# Altium PCB PCB1.PcbDoc
Units mm, origin at the board's own origin, x right, y up, seen from the top; angles counter-clockwise.
Board outline 152.4 x 101.6 mm, 2 copper layers (Top Layer, Bottom Layer); 23 components, 48 nets, 153 pads, 0 vias.
Unrouted connection lines stored in the file: 73.
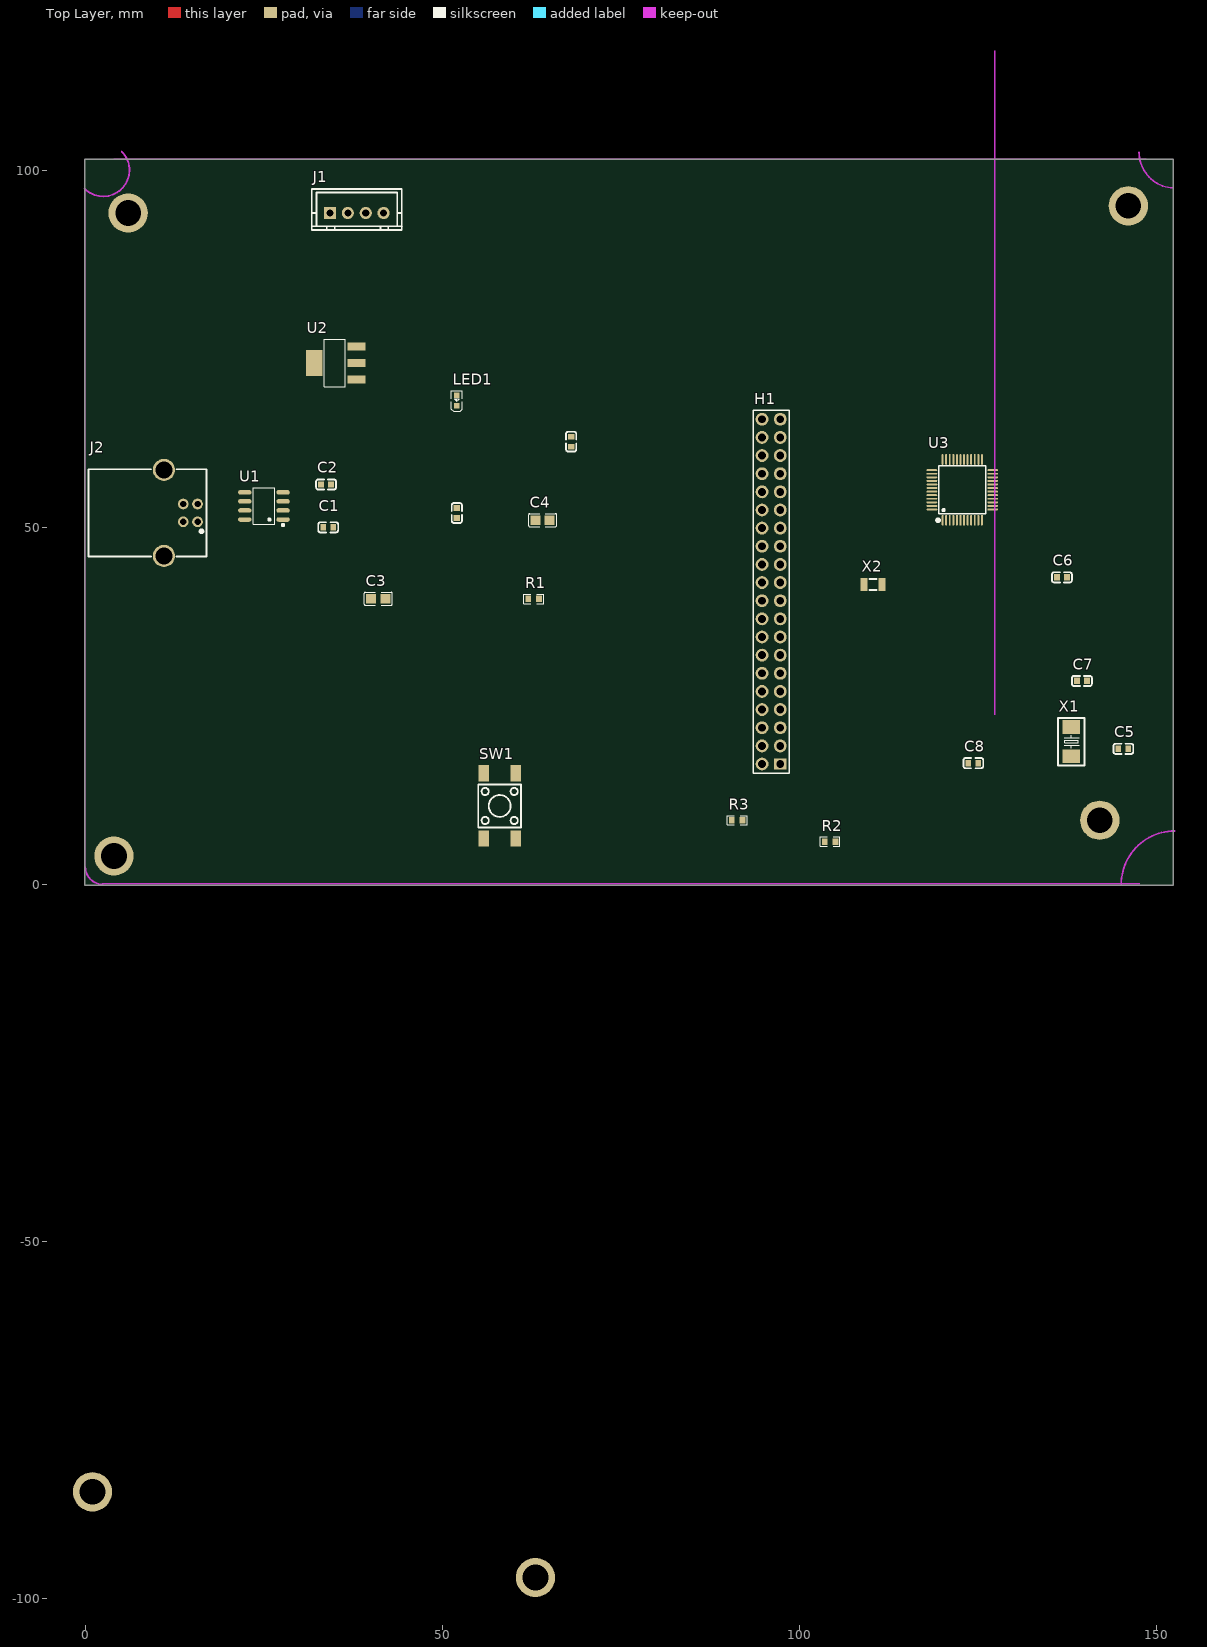
[diagram p0: Top Layer view]
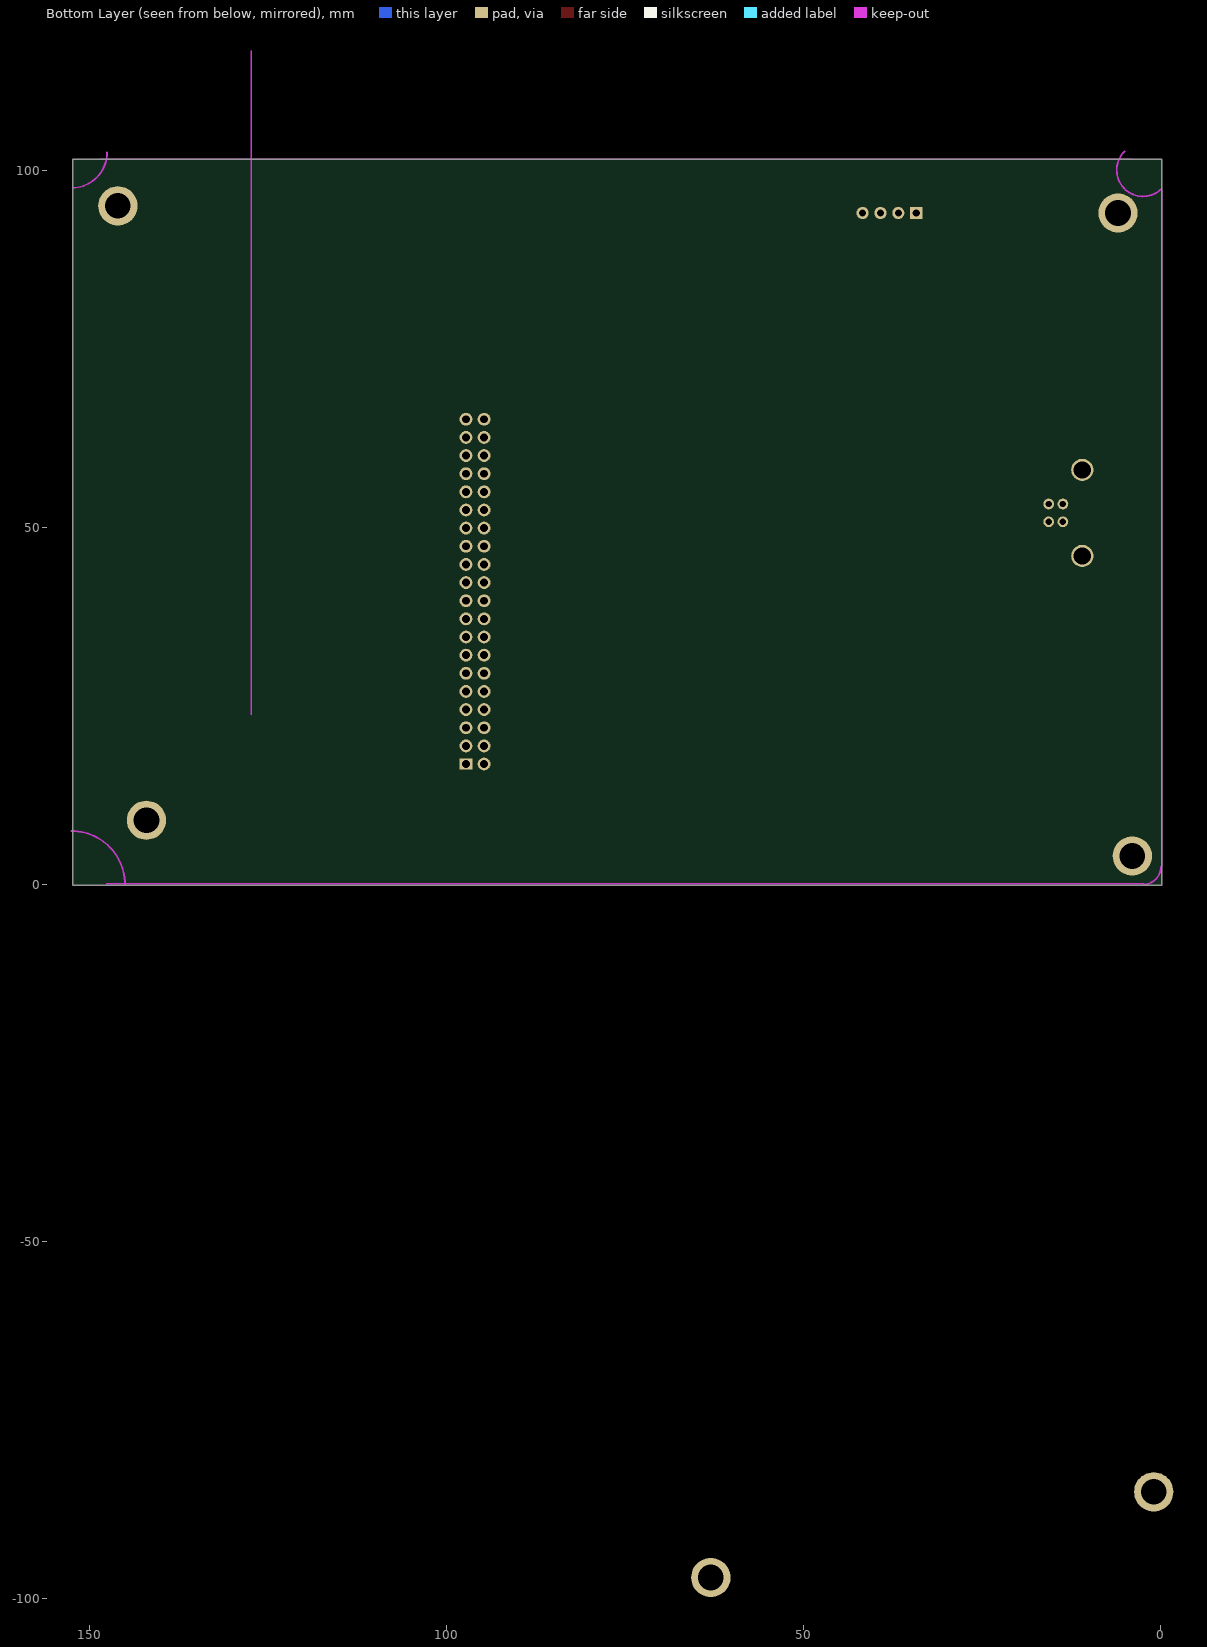
[diagram p1: Bottom Layer view, seen from below]

## Layer stack, top to bottom
Top Solder: solder mask 0.0102, Solder Resist, Dk 3.5
Top Layer: signal copper 0.0356
Dielectric 1: dielectric 0.32, FR-4, Dk 4.8
Bottom Layer: signal copper 0.0356
Bottom Solder: solder mask 0.0102, Solder Resist, Dk 3.5

## Board outline
-0.1,-0.1 152.3,-0.1 152.3,101.5 -0.1,101.5

## Design rules (kind name [scope] priority, off if disabled: settings)
Clearance [All] p1: gap=0.254 ignorepadtopadclearanceinfootprint=FALSE except(0: Arc-Hole Track-Hole SMDPad-Hole THPad-Hole Via-Hole Fill-Hole Poly-Hole Region-Hole Text-Hole)
PolygonConnect [All] p1: connectstyle=Relief reliefconductorwidth=0.254 reliefentries=4 polygonreliefangle="90 Angle" airgapwidth=0.254
RoutingVias [All] p1: holewidth=0.711 width=1.27 viastyle="Through Hole" minholewidth=0.711 minwidth=1.27 maxholewidth=0.711 maxwidth=1.27
SolderMaskExpansion [All] p1: expansion=0.102 istentingtop=FALSE
Width [All] p1: maxlimit=0.254 minlimit=0.254 preferedwidth=0.254
30 further rules are at their usual default settings.

## Components (designator, comment, footprint, x,y, rotation, side; value= is the part's Value field where it differs from the comment)
C1 "cc0603krx7r9bb104" C0603 34,50 r0 top value=100nF
C2 "cc0603krx7r9bb104" C0603 33.7,56 r0 top value=100nF
C3 "cl21a106kaynnne_c15850" C0805 41,40 r0 top value=10uF
C4 "cl21a106kaynnne_c15850" C0805 64,51 r0 top value=10uF
C5 "cc0603jrnpo9bn200" C0603 145.3,19 r0 top value=20pF
C6 "cc0603jrnpo9bn200" C0603 136.7,43 r0 top value=20pF
C7 "cc0603jrnpo9bn200" C0603 139.5,28.5 r0 top value=20pF
C8 "cc0603jrnpo9bn200" C0603 124.3,17 r0 top value=20pF
H1 "2.54mm 2*20p直排针" HDR-TH_40P-P2.54-V-M-R2-C20-S2.54 96,41 r90 top
J1 "xh-4a_c37815" CONN-TH_4P-P2.50_XH-4A 38,94 r0 top
J2 "921-111a1010d10200" USB-B_TH_USB-B-FEMALE-90 13.355,52.02 r270 top locked
LED1 "ncd0603c1" LED0603-RD 52,67.749 r90 top
R1 "0603waf1001t5e" R0603 62.753,40 r0 top value=1kΩ
R2 "0603waf1002t5e" R0603 104.247,6 r0 top value=10kΩ
R3 "0603waf1002t5e" R0603 91.247,9 r0 top value=10kΩ
SW1 "kh-6x6x5h-stm" SW-SMD_4P-L6.0-W6.0-P4.50-LS9.0_H5.0 58,11 r90 top
U1 "ch340n" SOP-8_L4.9-W3.9-P1.27-LS6.0-BL 25,53 r90 top
U2 "ams1117-3.3_c6186" SOT-223-3_L6.5-W3.4-P2.30-LS7.0-BR 35,73 r0 top
U3 "stm32f103c8t6" LQFP-48_L7.0-W7.0-P0.50-LS9.0-BL 122.75,55.25 r0 top
X1 "x50328msb2gi" CRYSTAL-SMD_L5.0-W3.2 138,20 r90 top value=8MHz
X2 "q13fc13500004_c32346" FC-135R_L3.2-W1.5 110.25,42 r0 top value=32.768kHz
? "cc0603krx7r9bb104" C0603 52,52 r90 top value=100nF
? "cc0603krx7r9bb104" C0603 68,62 r90 top value=100nF

## Footprints (in the part's own frame and the unit in brackets; to place one, negate y for a bottom-side part, rotate by r counter-clockwise, add the part's x,y. Pads: shape width x height; smd on the part's side, far side on the other; paste and mask are expansions set on the pad)
C0603 [mm]
  rect 0.8x0.9 smd: 1(-0.7,0) 2(0.7,0)
  silkscreen extent -1.39,-0.71 1.39,0.71
C0805 [mm]
  rect 1.41x1.35 smd paste-100 mask+0.051: 1(-1,0) 2(1,0)
  silkscreen extent -1.96,-0.9 1.96,0.9
CONN-TH_4P-P2.50_XH-4A [mm]
  rect 1.7x1.7 hole 1: 1(-3.75,0)
  round 1.7 hole 1: 2(-1.25,0) 3(1.25,0) 4(3.75,0)
  silkscreen extent -6.3,-2.4 6.31,3.38
CRYSTAL-SMD_L5.0-W3.2 [mm]
  rect 1.9x2.4 smd: 1(-2.05,0) 2(2.05,0)
  silkscreen extent -3.32,-1.85 3.33,1.85
FC-135R_L3.2-W1.5 [mm]
  rect 1x1.8 smd: 1(-1.25,0) 2(1.25,0)
  silkscreen extent -0.51,-0.76 0.51,0.76
HDR-TH_40P-P2.54-V-M-R2-C20-S2.54 [mm]
  rect 1.575x1.8 hole 1.1: 1(-24.13,-1.27)
  round 1.8 hole 1.1: 2(-24.13,1.27) 3(-21.59,-1.27) 4(-21.59,1.27) 5(-19.05,-1.27) 6(-19.05,1.27) 7(-16.51,-1.27) 8(-16.51,1.27) 9(-13.97,-1.27) 10(-13.97,1.27) 11(-11.43,-1.27) 12(-11.43,1.27) 13(-8.89,-1.27) 14(-8.89,1.27) 15(-6.35,-1.27) 16(-6.35,1.27) 17(-3.81,-1.27) 18(-3.81,1.27) 19(-1.27,-1.27) 20(-1.27,1.27) 21(1.27,-1.27) 22(1.27,1.27) 23(3.81,-1.27) 24(3.81,1.27) 25(6.35,-1.27) 26(6.35,1.27) 27(8.89,-1.27) 28(8.89,1.27) 29(11.43,-1.27) 30(11.43,1.27) 31(13.97,-1.27) 32(13.97,1.27) 33(16.51,-1.27) 34(16.51,1.27) 35(19.05,-1.27) 36(19.05,1.27) 37(21.59,-1.27) 38(21.59,1.27) 39(24.13,-1.27) 40(24.13,1.27)
  silkscreen extent -25.4,-2.54 25.4,2.54
LED0603-RD [mm]
  rect 0.8x0.8 smd: 1(-0.749,0) 2(0.749,0)
  silkscreen extent -1.49,-0.75 1.39,0.76
LQFP-48_L7.0-W7.0-P0.50-LS9.0-BL [mm]
  oval 0.27x1.5 smd paste+0 mask+0.05: 1(-2.75,-4.25) 2(-2.25,-4.25) 3(-1.75,-4.25) 4(-1.25,-4.25) 5(-0.75,-4.25) 6(-0.25,-4.25) 7(0.25,-4.25) 8(0.75,-4.25) 9(1.25,-4.25) 10(1.75,-4.25) 11(2.25,-4.25) 12(2.75,-4.25) 25(2.75,4.25) 26(2.25,4.25) 27(1.75,4.25) 28(1.25,4.25) 29(0.75,4.25) 30(0.25,4.25) 31(-0.25,4.25) 32(-0.75,4.25) 33(-1.25,4.25) 34(-1.75,4.25) 35(-2.25,4.25) 36(-2.75,4.25)
  oval 1.5x0.27 smd paste+0 mask+0.05: 13(4.25,-2.75) 14(4.25,-2.25) 15(4.25,-1.75) 16(4.25,-1.25) 17(4.25,-0.75) 18(4.25,-0.25) 19(4.25,0.25) 20(4.25,0.75) 21(4.25,1.25) 22(4.25,1.75) 23(4.25,2.25) 24(4.25,2.75) 37(-4.25,2.75) 38(-4.25,2.25) 39(-4.25,1.75) 40(-4.25,1.25) 41(-4.25,0.75) 42(-4.25,0.25) 43(-4.25,-0.25) 44(-4.25,-0.75) 45(-4.25,-1.25) 46(-4.25,-1.75) 47(-4.25,-2.25) 48(-4.25,-2.75)
  silkscreen extent -3.59,-4.46 3.3,3.34
R0603 [mm]
  rect 0.806x0.864 smd paste-100 mask+0.051: 1(-0.753,0) 2(0.753,0)
  silkscreen extent -1.39,-0.66 1.39,0.66
SOP-8_L4.9-W3.9-P1.27-LS6.0-BL [mm]
  oval 0.63x1.865 smd: 1(-1.905,-2.682) 2(-0.635,-2.682) 3(0.635,-2.682) 4(1.905,-2.682) 5(1.905,2.682) 6(0.635,2.682) 7(-0.635,2.682) 8(-1.905,2.682)
  silkscreen extent -2.82,-2.83 2.58,1.52
SOT-223-3_L6.5-W3.4-P2.30-LS7.0-BR [mm]
  rect 2.5x1.1 smd: 1(2.97,-2.3) 2(2.97,0) 3(2.97,2.3)
  rect 2.34x3.6 smd: 4(-2.97,0)
  silkscreen extent -1.57,-3.33 1.37,3.33
SW-SMD_4P-L6.0-W6.0-P4.50-LS9.0_H5.0 [mm]
  rect 2.3x1.5 smd: 1(-4.55,2.25) 2(4.55,2.25) 3(-4.55,-2.25) 4(4.55,-2.25)
  silkscreen extent -3,-3 3,3
USB-B_TH_USB-B-FEMALE-90 [mm]
  round 1.5 hole 0.9 copper offset 0,0: 1(1.25,2.355) 2(-1.25,2.355) 3(-1.25,0.355) 4(1.25,0.355)
  round 3.1 hole 2.4 copper offset 0,0: 5(-6.02,-2.355) 6(6.02,-2.355)
  silkscreen extent -6.1,-12.89 6.1,3.61

## Part data
C1 C2 ? ?: "容值:100nF;精度:±10%;额定电压:50V;温度系数:X7R;", JLCPCB Part Class="Basic Part", LCSC Part Name="100nF ±10% 50V", Manufacturer=YAGEO(国巨), ManufacturerPart=CC0603KRX7R9BB104, Temperature Coefficient=X7R, Tolerance=±10%, Voltage Rating=50V, AddInBom=yes, ConvertToPcb=yes, Datasheet=https://item.szlcsc.com/datasheet/CC0603KRX7R9BB104/15331.html, FootprintName=C0603, ModelId=ac125912035d415993ca9572d50418b1, ModelName=C0603_L1.6-W0.8-H0.8, ModelTransform=62.992,31.496,0,0,0,0,0,0,0, Supplier=LCSC, Supplier Footprint=0603, SupplierPart=C14663, SymbolName=CC0603KRX7R9BB104
C3 C4: "容值:10uF;精度:±10%;额定电压:25V;温度系数:X5R;", JLCPCB Part Class="Basic Part", LCSC Part Name="10uF ±10% 25V", Manufacturer=SAMSUNG(三星), ManufacturerPart=CL21A106KAYNNNE, Temperature Coefficient=X5R, Tolerance=±10%, Voltage Rating=25V, AddInBom=yes, ConvertToPcb=yes, Datasheet=https://item.szlcsc.com/datasheet/CL21A106KAYNNNE/16532.html, FootprintName=C0805, ModelId=1ba041120af144c991958decab20d241, ModelName=C0805_L2.0-W1.3-H1.3, ModelTransform=78.74,51.181,0,0,0,0,0,0.0005,0, Supplier=LCSC, Supplier Footprint=0805, SupplierPart=C15850, Symbol=CL21A106KAYNNNE
C5 C6 C7 C8: "容值:20pF;精度:±5%;额定电压:50V;材质(温度系数):NP0;", JLCPCB Part Class="Extended Part", LCSC Part Name="20pF ±5% 50V", Manufacturer=YAGEO(国巨), ManufacturerPart=CC0603JRNPO9BN200, Temperature Coefficient=NP0, Tolerance=±5%, Voltage Rated=50V, AddInBom=yes, ConvertToPcb=yes, Datasheet=https://atta.szlcsc.com/upload/public/pdf/source/20170505/1493957838062.pdf, FootprintName=C0603, ModelId=ac125912035d415993ca9572d50418b1, ModelName=C0603_L1.6-W0.8-H0.8, ModelTransform=62.992,31.496,0,0,0,0,0,0,0, Supplier=LCSC, Supplier Footprint=0603, SupplierPart=C105621, Symbol=CC0603JRNPO9BN200
H1: "插针结构:2x20P;间距:2.54mm;行距:2.54mm;圆针/方针:方针;安装方式:直插;排数:双排;总PIN位数:40P;额定电流:3A;额定电压:-;配合针长度:6mm;塑高:-;端接针长度:3mm;触头材质:黄铜;触头镀层:-;工作温度:-40℃~+105℃;颜色:黑色;", Color=黑色, Current Rating=3A, JLCPCB Part Class="Extended Part", LCSC Part Name="2x20P 间距:2.54mm 方针 直插", Manufacturer=BOOMELE(博穆精密), ManufacturerPart="2.54mm 2*20P直排针", Operating Temperature=-40℃~+105℃, Voltage Rating (Max)=-, AddInBom=yes, Circluar Pins/Square Pins=方针, Contact Material=黄铜, Contact Plating=-, ConvertToPcb=yes, Datasheet=https://item.szlcsc.com/datasheet/2.54mm%25202*20P%25E7%259B%25B4%25E6%258E%2592%25E9%2592%2588/51992.html, FootprintName=HDR-TH_40P-P2.54-V-M-R2-C20-S2.54, Insulation Height=-, Length of End Connection Pin=3mm, Length of Mating Pin=6mm, ModelId=2f697d2f705a4509bdac70452e51b3cc, ModelName=HDR-TH_40P-P2.54-M-LI-2X20P, ModelTransform=1999.996,196.85,0,0,0,0,0,0,-118.11, Mounting Type=直插, Number of Pins=40P, Number of Rows=双排, Pin Structure=2x20P, Pitch=2.54mm, Row Spacing=2.54mm, Supplier=LCSC, Supplier Footprint=插件,P=2.54mm, SupplierPart=C50980, Symbol=Header-Male-2.54_2x20
J1: "插针结构:1x4P;间距:2.5mm;安装方式:直插;参考系列:XH;总PIN数:4P;排数:1;每排PIN数:4;行距:-;额定电流:-;触头材质:-;触头镀层:-;工作温度:-;", Color=白色, Current Rating=-, JLCPCB Part Class="Extended Part", LCSC Part Name="1x4P 间距:2.5mm 直插 系列:XH", Manufacturer=BOOMELE(博穆精密), ManufacturerPart=XH-4A, AddInBom=yes, Contact Material=-, Contact Plating=-, ConvertToPcb=yes, Datasheet=https://item.szlcsc.com/datasheet/XH-4A/38795.html, Flame Retardant Rating=-, FootprintName=CONN-TH_4P-P2.50_XH-4A, ModelId=5fb049f4745545a5b3e6d8e7931866fa, ModelName=CONN-TH_4P-P2.50_XH-4A, ModelTransform=492.125,224.409,0,180,0,0,0,17.913,-98.425, Mounting Type=直插, Number of Pins=4P, Number of PINs Per Row=4, Number of Rows=1, Operating Temperature=-, Pins Structure=1x4P, Pitch=2.5mm, Plastic Material=-, Reference Series=XH, Row Spacing=-, Supplementary Features=-, Supplier=LCSC, Supplier Footprint=插件,P=2.5mm, SupplierPart=C37815, Symbol=XH-4A, Voltage Rating=-, X-Length of Bottom Edge on Board (Spacing Line)=12.5mm, Y-Width of Bottom Edge on Board=5.8mm, Z-Height of the Board=7mm
J2: "连接器类型:Type-B;协议标准:USB 2.0;公母:母;安装方式:弯插;触点数量:4P;端口数量:1;", Detection color=白色, JLCPCB Part Class="Extended Part", LCSC Part Name="Type-B 母 弯插", Manufacturer=精拓金, ManufacturerPart=921-111A1010D10200, AddInBom=yes, Connector Type=Type-B, ConvertToPcb=yes, Datasheet=https://item.szlcsc.com/datasheet/921-111A1010D10200/47396.html, FootprintName=USB-B_TH_USB-B-FEMALE-90, Gender=母, Length=16.3mm, ModelId=427257db465a432d8a34b597c871403b, ModelName=USB-B_TH_USB-B-FEMALE-90, ModelTransform=544.04938,649.605,0,0,0,0,-0.005,-175.199,-118.11, Mounting Type=弯插, Number of Contacts=4P, Number of Ports=1, Protocol Standard="USB 2.0", Supplier=LCSC, Supplier Footprint=插件, SupplierPart=C46392, Symbol=USB-B-Female-90
LED1: "灯头类型:-;发光颜色:黄绿色;正向压降(Vf):1.6V~2.6V;功率:65mW;测试电流:25mA;波长:565nm~578nm;二极管配置:独立二极管;透镜颜色:-;色温:-;发光强度:13mcd;发光角度:140°;载带方式:-;工作温度:-30℃~+85℃;", Color Temperature=-, Illumination Color=黄绿色, JLCPCB Part Class="Extended Part", LCSC Part Name=片式发光二极管, Manufacturer=国星光电, ManufacturerPart=NCD0603C1, Operating Temperature=-30℃~+85℃, Power(Watts)=65mW, Test Current=25mA, Voltage - Forward(Vf)=1.6V~2.6V, AddInBom=yes, ConvertToPcb=yes, Datasheet=https://item.szlcsc.com/datasheet/NCD0603C1/85433.html, Diode Configuration=独立二极管, Emitting Material=-, ESD Withstand Voltage=-, FootprintName=LED0603-RD, Half wave width=15nm, Lamp Holder Type=-, Lens Color=-, Lumens=-, Luminous Intensity=13mcd, ModelId=1f0d29a91be547639d425604e9b96ebb, ModelName=LED0603-RD, ModelTransform=63.7794,32.283,0,0,0,0,0,0,0, Mounting Style=-, Peak Wavelength=576nm, Supplier=LCSC, Supplier Footprint=0603, SupplierPart=C84264, Symbol=FC-D1608HGK-572C, Viewing Angle=140°, Wavelength - Dominant=565nm~578nm
R1: "电阻类型:厚膜电阻;阻值:1kΩ;精度:±1%;功率:100mW;工作电压:75V;温度系数:±100ppm/℃;", JLCPCB Part Class="Basic Part", LCSC Part Name="1kΩ ±1% 100mW 厚膜电阻", Manufacturer=UNI-ROYAL(厚声), ManufacturerPart=0603WAF1001T5E, Operating Temperature=-55℃~+155℃, Power(Watts)=100mW, Temperature Coefficient=±100ppm/℃, Tolerance=±1%, Voltage-Supply(Max)=75V, AddInBom=yes, ConvertToPcb=yes, Datasheet=https://item.szlcsc.com/datasheet/0603WAF1001T5E/21904.html, FootprintName=R0603, ModelId=fc143cca1e79419f9cd78b61e9279f08, ModelName=R0603, ModelTransform=31.8897,63.7794,0,90,0,0,0,0,0, Supplier=LCSC, Supplier Footprint=0603, SupplierPart=C21190, Symbol=0603WAF1001T5E, Type=厚膜电阻
R2 R3: "电阻类型:厚膜电阻;阻值:10kΩ;精度:±1%;功率:100mW;工作电压:75V;温度系数:±100ppm/℃;", JLCPCB Part Class="Basic Part", LCSC Part Name="厚膜电阻 10kΩ ±1% 100mW", Manufacturer=UNI-ROYAL(厚声), ManufacturerPart=0603WAF1002T5E, Operating Temperature=-55℃~+155℃, Power(Watts)=100mW, Temperature Coefficient=±100ppm/℃, Tolerance=±1%, Voltage-Supply(Max)=75V, AddInBom=yes, ConvertToPcb=yes, Datasheet=https://item.szlcsc.com/datasheet/0603WAF1002T5E/26547.html, FootprintName=R0603, ModelId=fc143cca1e79419f9cd78b61e9279f08, ModelName=R0603, ModelTransform=31.8897,63.7794,0,90,0,0,0,0,0, Supplier=LCSC, Supplier Footprint=0603, SupplierPart=C25804, Symbol=0603WAF1002T5E, Type=厚膜电阻
SW1: "电路结构:单刀单掷;按钮形状:圆形按钮;安装方式:立贴;开关长度:6mm;开关宽度:6mm;开关高度:5mm;带支架:不带支架;触点电流:50mA;额定电压:12V;工作寿命:8万次;", Actuator/Cap Color=黑色, Contact Current=50mA, JLCPCB Part Class="Extended Part", LCSC Part Name="6*6*5mm 立贴 轻触开关", Manufacturer=kinghelm(金航标), ManufacturerPart=KH-6X6X5H-STM, Voltage Rating=12V, Actuator Style=圆形按钮, AddInBom=yes, Circuit=单刀单掷, ConvertToPcb=yes, Datasheet=https://item.szlcsc.com/datasheet/KH-6X6X5H-STM/3009601.html, FootprintName=SW-SMD_4P-L6.0-W6.0-P4.50-LS9.0_H5.0, Length=6mm, Life=8万次, ModelId=46371efb35684031937580a0045530ec, ModelName=SW-SMD_4P-L6.0-W6.0-P4.50-LS9.0_H5.0, ModelTransform=354.33,236.25937,0,0,0,0,0,0,0, Mounting Type=立贴, Supplier=LCSC, Supplier Footprint=SMD-4P,6x6mm, SupplierPart=C2837531, Switch Height=5mm, Symbol=KH-6X6X5H-STM, Termination Style=鸥翼型, Width=6mm, with Bracket=不带支架
U1: "应用功能:USB转串口;USB协议版本:USB 2.0;通道数:1;数据速率:2Mbps;", JLCPCB Part Class="Extended Part", LCSC Part Name=USB2.0芯片CH340, Manufacturer=WCH(南京沁恒), ManufacturerPart=CH340N, Operating Temperature=-20℃~+70℃, Voltage - Supply=3.3V；5V, AddInBom=yes, Applications Function=USB转串口, ConvertToPcb=yes, Data Rate=2Mbps, Datasheet=https://item.szlcsc.com/datasheet/CH340N/3390257.html, Features=可编程波特率；内置时钟发生器；上电复位, FootprintName=SOP-8_L4.9-W3.9-P1.27-LS6.0-BL, ModelId=75c24a7891ee4dd6bdac16a7163ff87e, ModelName=SOP-8_L4.9-W3.9-P1.27-LS6.0-BL-1, ModelTransform=192.913,236.22,0,0,0,0,-0.393,2.749,0, Number of Channels=1, Supplier=LCSC, Supplier Footprint=SOP-8, SupplierPart=C2977777, Symbol=CH340N_C2977777, USB Protocol="USB 2.0"
U2: "输出极性:正极;工作电压:15V;输出电压:3.3V;输出电流:1A;电源纹波抑制比(PSRR):72dB@(120Hz);输出类型:固定;", JLCPCB Part Class="Basic Part", LCSC Part Name="3.3V 1A 15V", Manufacturer="Advanced Monolithic Systems", ManufacturerPart=AMS1117-3.3, Operating Temperature=-40℃~+125℃, Output Current=1A, Output Voltage=3.3V, Power Supply Rejection Ratio (PSRR)=72dB@(120Hz), standby current=5mA, Voltage - Supply=15V, Voltage Dropout=1.1V@(800mA), AddInBom=yes, ConvertToPcb=yes, Datasheet=https://item.szlcsc.com/datasheet/AMS1117-3.3/6652.html, Features=短路保护；热关断；过流保护, FootprintName=SOT-223-3_L6.5-W3.4-P2.30-LS7.0-BR, ModelId=925194bf9823436183a3e0b978a8d076, ModelName=SOT-223-4P_L6.5-W3.5-H1.6-LS7.0-P2.30, ModelTransform=279.89794,255.905,0,180,0,0,-3.9385,-0.0005,0, Noise=0.003%Vout, Number of Outputs=1, Output Configuration=正极, Output Type=固定, Supplier=LCSC, Supplier Footprint=SOT-223, SupplierPart=C6186, SymbolName=AMS1117-3.3
U3: "CPU内核:ARM Cortex-M3;CPU最大主频:72MHz;CPU位数:32 Bit;", JLCPCB Part Class="Extended Part", LCSC Part Name="主流增强型ARM Cortex-M3 MCU，具有64 KB Flash、72 MHz CPU、电机控制、USB和CAN", Manufacturer=ST(意法半导体), ManufacturerPart=STM32F103C8T6, Operating Temperature=-40℃~+85℃, Voltage - Supply=2V~3.6V, ADC (Bit)=12bit, AddInBom=yes, ConvertToPcb=yes, Core Size="32 Bit", CPU Core="ARM Cortex-M3", CPU Maximum Speed=72MHz, Datasheet=https://item.szlcsc.com/datasheet/STM32F103C8T6/9243.html, EEPROM=-, FootprintName=LQFP-48_L7.0-W7.0-P0.50-LS9.0-BL, ModelId=093be70396ff421eb2cdb946d5311efc, ModelName=LQFP-48_L7.0-W7.0-H1.4-LS9.0-P0.50, ModelTransform=354.331,354.331,0,0,0,0,0,0,0, Number of I/O=37, Oscillator Type=内置, Program Memory Type=FLASH, Program Storage Size=64KB, RAM Size=20KB, Supplier=LCSC, Supplier Footprint=LQFP-48(7x7), SupplierPart=C8734, Symbol=STM32F103C8T6
X1: "晶振类型:贴片晶振;频率:8MHz;常温频差:±10ppm;负载电容:20pF;频率稳定度:±20ppm;", Equivalent Series Resistance(ESR)=80Ω, Frequency Stability=±20ppm, JLCPCB Part Class="Basic Part", LCSC Part Name="YSX530GA 8MHZ 2P 5032 20PF ±10PPM -40~85℃ (±20PPM)", Load Capacitance=20pF, Manufacturer=YXC(扬兴晶振), ManufacturerPart=X50328MSB2GI, Normal temperature Frequency Tolerance=±10ppm, Operating Temperature=-40℃~+85℃, AddInBom=yes, ConvertToPcb=yes, Datasheet=https://item.szlcsc.com/datasheet/X50328MSB2GI/117214.html, FootprintName=CRYSTAL-SMD_L5.0-W3.2, ModelId=d7c39c66443246ff83c2003c1e1eb6f1, ModelName=CRYSTAL-SMD_L5.0-W3.2, ModelTransform=196.85,125.984,0,0,0,0,0,0,0, Supplier=LCSC, Supplier Footprint=SMD5032-2P, SupplierPart=C115962, Symbol=X50328MSB2GI, Type=贴片晶振
X2: "晶振类型:贴片晶振;频率:32.768kHz;常温频差:±20ppm;负载电容:12.5pF;", Equivalent Series Resistance(ESR)=70kΩ, JLCPCB Part Class="Basic Part", LCSC Part Name="32.768kHz ±20ppm 12.5pF", Load Capacitance=12.5pF, Manufacturer=EPSON(爱普生), ManufacturerPart=Q13FC13500004, Normal temperature Frequency Tolerance=±20ppm, Operating Temperature=-40℃~+85℃, AddInBom=yes, ConvertToPcb=yes, Datasheet=https://item.szlcsc.com/datasheet/Q13FC13500004/33310.html, FootprintName=FC-135R_L3.2-W1.5, ModelId=751105e878f044059ef0ee72de95f96e, ModelName=FC-135R_L3.2-W1.5, ModelTransform=125.984,59.055,0,0,0,0,0,0,0, Supplier=LCSC, Supplier Footprint=SMD3215-2P, SupplierPart=C32346, Symbol=Q13FC1350000400, Type=贴片晶振

## Free pads (board coordinates)
  round 5.5 hole 3.6: 0(1,-85) 0(4,4) 0(63,-97) 9(146,95) 10(142,9) g(6,94)
  round 1.524 hole 0.762: 6(4,4)

## Nets (pads, with @x,y where several pads share a name; then routed paths per layer and width w, separated by ;. In a path a pad name is that pad's centre, name@x,y a point inside that pad or via, vN(x,y) a via of type N, cw(c..) or ccw(c..) an arc to the next point about the centre after c; other vN are vias at no path point)
BOOT0: U3.44
D+: J2.3 U1.1
D-: J2.2 U1.2
GND: ?.2 C1.2 C2.1 C3.1 C4.1 C5.1 C6.1 C7.1 C8.1 H1.1 H1.2 H1.39 H1.40 J1.3 J2.4 J2.5 J2.6 R1.1 R2.2 R3.2 U1.3 U2.1 U3.35 U3.47
NetC1_1: C1.1 U1.8
NetLabel116: H1.34
NetLED1_1: LED1.1 R1.2
NetR3_1: R3.1 SW1.3 SW1.4
"OSC32 IN": C7.2 X2.2
"OSC32 OUT": C8.2 X2.1
"OSC IN": C5.2 X1.1
"OSC OUT": C6.2 U3.6 X1.2
PA0: H1.16 U3.10
PA1: H1.17
PA4: H1.20
PA5: H1.21 U3.15
PA6: H1.22 U3.16
PA7: H1.23 U3.17
PA8: H1.33 U3.29
PA11: H1.5 U3.32
PA12: H1.6
PA15: H1.7
PB0: H1.24 U3.18
PB1: H1.25 U3.19
PB2: H1.26 R2.1
PB3: H1.8 U3.39
PB4: H1.9 U3.40
PB5: H1.10
PB8: H1.13 U3.45
PB9: H1.14 U3.46
PB10: H1.27
PB11: H1.28
PB12: H1.29 U3.25
PB15: H1.32
PC13: H1.15
RXD1: H1.4 U3.30
RXD2: H1.19
SCL1: H1.11
SDA1: H1.12 U3.43
"SW DOWN": H1.31 U3.27
"SW UP": H1.30 U3.26
SWCLK: J1.2
SWDIO: J1.1 U3.34
TXD1: H1.3
TXD2: H1.18 U3.12
VCC3.3V: ?.1@52,51.3 C3.2 J1.4 LED1.2 SW1.1 SW1.2 U2.2 U2.4
VCC3V3: H1.35 H1.36 U3.1 U3.36 U3.48
VCC5V: ?.1@68,61.3 C2.2 C4.2 H1.37 H1.38 J2.1 U1.5 U2.3
pads on no net: U1.4 U1.6 U1.7 U3.2 U3.3 U3.4 U3.5 U3.7 U3.8 U3.9 U3.11 U3.13 U3.14 U3.20 U3.21 U3.22 U3.23 U3.24 U3.28 U3.31 U3.33 U3.37 U3.38 U3.41 U3.42

## Keep-outs
Keep-Out Layer:
  lines w0.2: -0.1,2.6 -0.1,97.4 ; 2.4,0.1 147.6,0.1 ; 4,101.5 148.5,101.5 ; 127.3,23.8 127.3,116.7
  lines w0.254: -0.1,97.4 ccw(c2.5,100) 5.1,102.6 ; 0,2.5 ccw(c2.5,2.5) 2.396,0.002 ; 145,0 cw(c152.5,0) 152.5,7.5 ; 147.5,102.5 ccw(c152.5,102.5) 152.292,97.504